# Altium PCB Octo-Electrode.PcbDoc (part 3 of 6)
Units mm, origin at the board's own origin, x right, y up, seen from the top; angles counter-clockwise.
Board outline 202.91 x 135.89 mm, 2 copper layers (Top Layer, Bottom Layer); 289 components, 165 nets, 790 pads, 510 vias.
Unrouted connection lines stored in the file: 83.
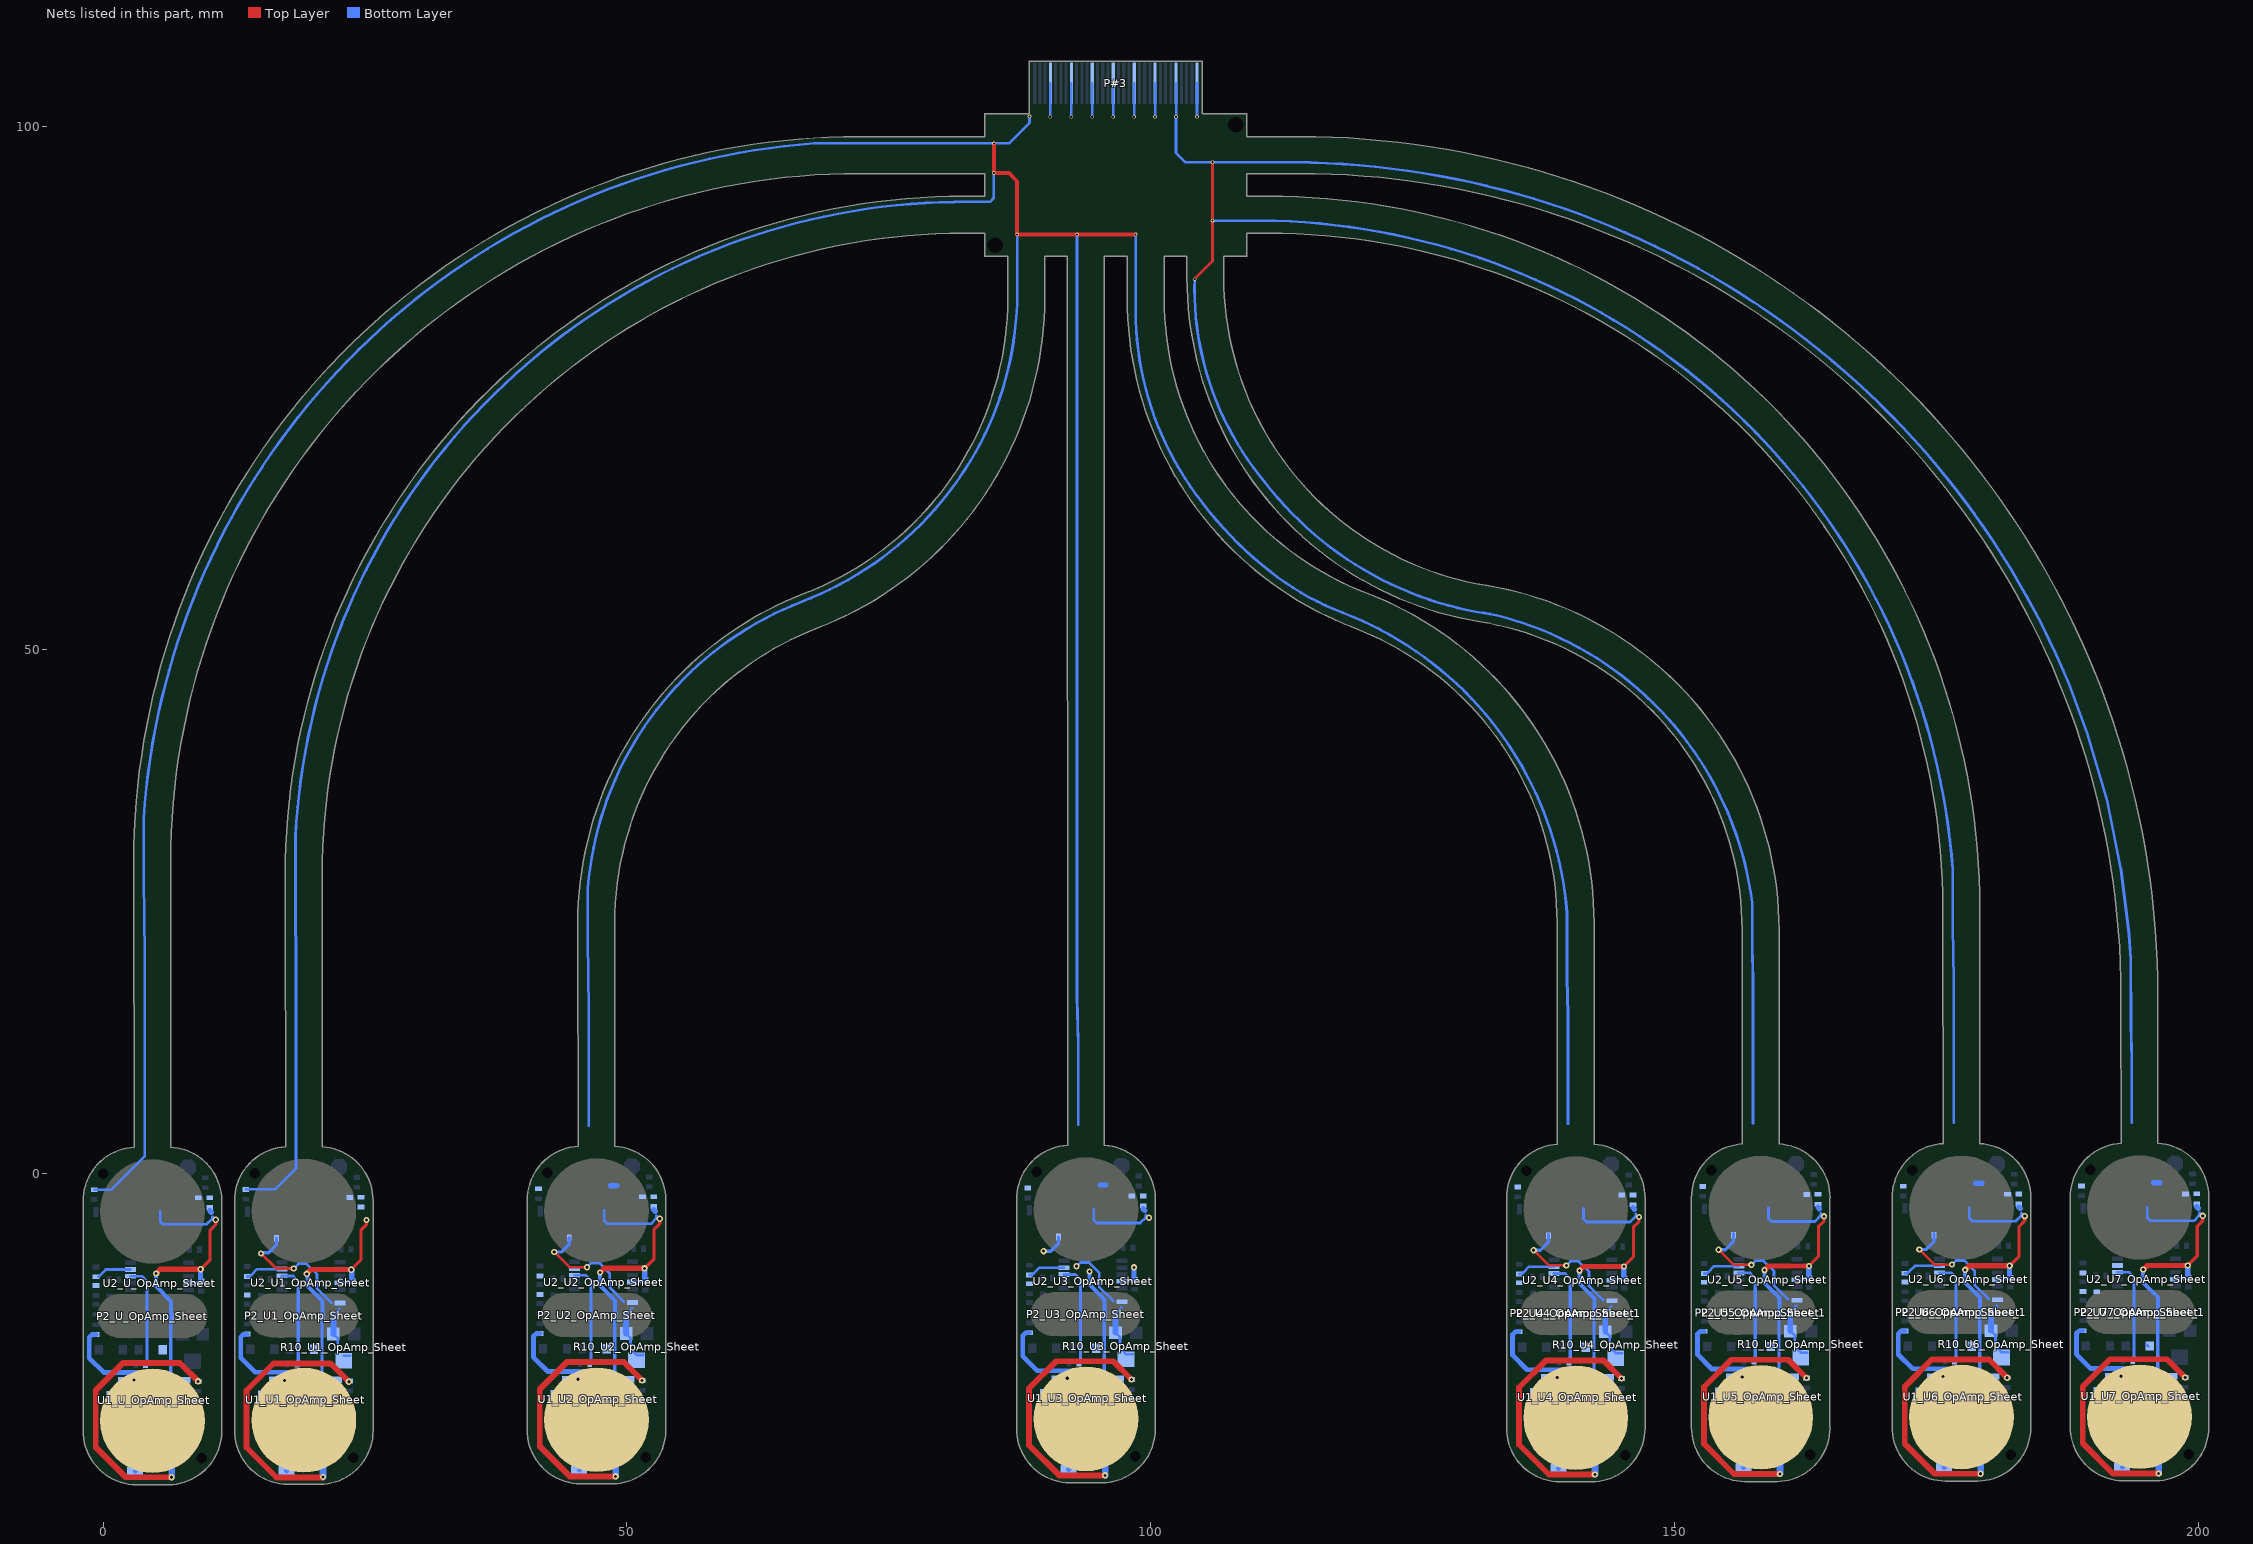
[diagram p2: the nets of this part, all layers, seen from the top]

## Via types
v1: diameter 0.6, hole 0.3, Top Layer to Bottom Layer, tented both sides, 464 vias
v2: diameter 0.35, hole 0.2, Top Layer to Bottom Layer, 46 vias

## Nets (pads, with @x,y where several pads share a name; then routed paths per layer and width w, separated by ;. In a path a pad name is that pad's centre, name@x,y a point inside that pad or via, vN(x,y) a via of type N, cw(c..) or ccw(c..) an arc to the next point about the centre after c; other vN are vias at no path point) (continued)
IN2N_U7_OpAmp_Sheet: R3_U7_OpAmp_Sheet.1 R4_U7_OpAmp_Sheet_1.2 R7_U7_OpAmp_Sheet.1 U2_U7_OpAmp_Sheet.6
IN2N_U_OpAmp_Sheet: R3_U_OpAmp_Sheet.1 R7_U_OpAmp_Sheet.1 U2_U_OpAmp_Sheet.6 | length 3.3
  Bottom Layer w0.254: R7_U_OpAmp_Sheet.1@-0.444,-9.842 -0.305,-9.703 0.259,-9.139 U2_U_OpAmp_Sheet.6@2.609,-9.139
IN2P_U1_OpAmp_Sheet: D2_U1_OpAmp_Sheet.1 R6_U1_OpAmp_Sheet.2 U2_U1_OpAmp_Sheet.5 | length 10.1
  Bottom Layer w0.254: U2_U1_OpAmp_Sheet.5@17.031,-9.765 17.056,-9.765 18.14,-9.765 18.625,-10.25 18.625,-10.948 ; D2_U1_OpAmp_Sheet.1@19.807,-16.737 19.807,-16.634 D2_U1_OpAmp_Sheet.1@20.014,-16.841
  Bottom Layer w0.305: R6_U1_OpAmp_Sheet.2@18.625,-18.162 18.625,-10.948
IN2P_U2_OpAmp_Sheet: D2_U2_OpAmp_Sheet.1 R6_U2_OpAmp_Sheet.2 U2_U2_OpAmp_Sheet.5 | length 10.1
  Bottom Layer w0.254: U2_U2_OpAmp_Sheet.5@44.974,-9.7 44.999,-9.7 46.082,-9.7 46.568,-10.186 46.568,-10.884 ; D2_U2_OpAmp_Sheet.1@47.749,-16.673 47.749,-16.569 D2_U2_OpAmp_Sheet.1@47.956,-16.776
  Bottom Layer w0.305: R6_U2_OpAmp_Sheet.2@46.568,-18.097 46.568,-10.884
IN2P_U3_OpAmp_Sheet: D2_U3_OpAmp_Sheet.1 R6_U3_OpAmp_Sheet.2 U2_U3_OpAmp_Sheet.5 | length 10.1
  Bottom Layer w0.254: U2_U3_OpAmp_Sheet.5@91.695,-9.624 91.72,-9.624 92.804,-9.624 93.289,-10.109 93.289,-10.807 ; D2_U3_OpAmp_Sheet.1@94.47,-16.597 94.47,-16.493 D2_U3_OpAmp_Sheet.1@94.678,-16.7
  Bottom Layer w0.305: R6_U3_OpAmp_Sheet.2@93.289,-18.021 93.289,-10.807
IN2P_U4_OpAmp_Sheet: D2_U4_OpAmp_Sheet.1 R6_U4_OpAmp_Sheet.2 U2_U4_OpAmp_Sheet.5 | length 10.1
  Bottom Layer w0.254: U2_U4_OpAmp_Sheet.5@138.45,-9.522 138.475,-9.522 139.559,-9.522 140.044,-10.008 140.044,-10.706 ; D2_U4_OpAmp_Sheet.1@141.225,-16.495 141.225,-16.391 D2_U4_OpAmp_Sheet.1@141.433,-16.599
  Bottom Layer w0.305: R6_U4_OpAmp_Sheet.2@140.044,-17.919 140.044,-10.706
IN2P_U5_OpAmp_Sheet: D2_U5_OpAmp_Sheet.1 R6_U5_OpAmp_Sheet.2 U2_U5_OpAmp_Sheet.5 | length 10.1
  Bottom Layer w0.254: U2_U5_OpAmp_Sheet.5@156.111,-9.472 156.136,-9.472 157.22,-9.472 157.705,-9.957 157.705,-10.655 ; D2_U5_OpAmp_Sheet.1@158.886,-16.444 158.886,-16.34 D2_U5_OpAmp_Sheet.1@159.094,-16.548
  Bottom Layer w0.305: R6_U5_OpAmp_Sheet.2@157.705,-17.869 157.705,-10.655
IN2P_U6_OpAmp_Sheet: D2_U6_OpAmp_Sheet.1 R6_U6_OpAmp_Sheet.2 U2_U6_OpAmp_Sheet.5 | length 10.1
  Bottom Layer w0.254: U2_U6_OpAmp_Sheet.5@175.27,-9.446 175.295,-9.446 176.379,-9.446 176.864,-9.932 176.864,-10.63 ; D2_U6_OpAmp_Sheet.1@178.045,-16.419 178.045,-16.315 D2_U6_OpAmp_Sheet.1@178.253,-16.522
  Bottom Layer w0.305: R6_U6_OpAmp_Sheet.2@176.864,-17.843 176.864,-10.63
IN2P_U7_OpAmp_Sheet: D2_U7_OpAmp_Sheet.1 R6_U7_OpAmp_Sheet.2 U2_U7_OpAmp_Sheet.5 | length 10.1
  Bottom Layer w0.254: U2_U7_OpAmp_Sheet.5@192.269,-9.421 192.294,-9.421 193.378,-9.421 193.863,-9.906 193.863,-10.604 ; D2_U7_OpAmp_Sheet.1@195.044,-16.393 195.044,-16.29 D2_U7_OpAmp_Sheet.1@195.252,-16.497
  Bottom Layer w0.305: R6_U7_OpAmp_Sheet.2@193.863,-17.818 193.863,-10.604
IN2P_U_OpAmp_Sheet: D2_U_OpAmp_Sheet.1 R6_U_OpAmp_Sheet.2 U2_U_OpAmp_Sheet.5 | length 9.7
  Bottom Layer w0.254: U2_U_OpAmp_Sheet.5@2.609,-9.789 3.693,-9.789 4.178,-10.275 4.178,-10.973
  Bottom Layer w0.305: R6_U_OpAmp_Sheet.2@4.178,-18.186 4.178,-10.973
Measure#_U1_OpAmp_Sheet: C3_U1_OpAmp_Sheet.1 P1_U1_OpAmp_Sheet.1 U1_U1_OpAmp_Sheet.7 | length 38.3
  Top Layer w0.254: v1@15.072,-7.597 16.522,-9.047 v1@18.2,-9.047
  Bottom Layer w0.254: v1@18.257,-8.997 18.643,-8.612 19.432,-8.612 20.416,-9.596 20.416,-10.948 21.762,-12.295 ; 21.972,-15.317 22.397,-15.742 22.397,-16.587 ; 21.972,-13.494 22.549,-12.917 ; 22.982,-17.375 23.184,-17.375 23.6,-17.375
  Bottom Layer w0.305: v1@15.13,-7.548 15.79,-7.548 16.543,-6.795 ; 16.548,-6.782 16.548,-6.167
  Bottom Layer w0.457: C3_U1_OpAmp_Sheet.1@13.761,-15.33 13.394,-15.33 13.126,-15.598 13.126,-17.578 14.498,-18.949 17.648,-18.949 18.41,-19.711 18.41,-21.896 18.41,-27.458 P1_U1_OpAmp_Sheet.1@17.495,-28.373 ; 18.511,-21.896 18.841,-22.226 U1_U1_OpAmp_Sheet.7@22.023,-22.226
  Bottom Layer w0.559: 21.972,-15.317 21.972,-13.494
  other v1: 18.195,-9.06 18.195,-9.06 15.067,-7.611 15.067,-7.611
Measure#_U2_OpAmp_Sheet: C3_U2_OpAmp_Sheet.1 P1_U2_OpAmp_Sheet.1 U1_U2_OpAmp_Sheet.7 | length 21.6
  Bottom Layer w0.457: C3_U2_OpAmp_Sheet.1@41.703,-15.265 41.337,-15.265 41.069,-15.533 41.069,-17.513 42.44,-18.885 45.59,-18.885 46.352,-19.647 46.352,-21.831 46.352,-27.394 P1_U2_OpAmp_Sheet.1@45.438,-28.308 ; 46.454,-21.831 46.784,-22.161 U1_U2_OpAmp_Sheet.7@49.966,-22.161
Measure#_U3_OpAmp_Sheet: C3_U3_OpAmp_Sheet.1 P1_U3_OpAmp_Sheet.1 U1_U3_OpAmp_Sheet.7 | length 21.6
  Bottom Layer w0.457: C3_U3_OpAmp_Sheet.1@88.425,-15.189 88.058,-15.189 87.79,-15.457 87.79,-17.437 89.162,-18.808 92.311,-18.808 93.073,-19.57 93.073,-21.755 93.073,-27.317 P1_U3_OpAmp_Sheet.1@92.159,-28.232 ; 93.175,-21.755 93.505,-22.085 U1_U3_OpAmp_Sheet.7@96.687,-22.085
Measure#_U4_OpAmp_Sheet: C3_U4_OpAmp_Sheet.1 P1_U4_OpAmp_Sheet.1 U1_U4_OpAmp_Sheet.7 | length 21.6
  Bottom Layer w0.457: C3_U4_OpAmp_Sheet.1@135.18,-15.087 134.813,-15.087 134.545,-15.355 134.545,-17.335 135.917,-18.707 139.066,-18.707 139.828,-19.469 139.828,-21.653 139.828,-27.216 P1_U4_OpAmp_Sheet.1@138.914,-28.13 ; 139.93,-21.653 140.26,-21.983 U1_U4_OpAmp_Sheet.7@143.442,-21.983
Measure#_U5_OpAmp_Sheet: C3_U5_OpAmp_Sheet.1 P1_U5_OpAmp_Sheet.1 U1_U5_OpAmp_Sheet.7 | length 21.6
  Bottom Layer w0.457: C3_U5_OpAmp_Sheet.1@152.841,-15.037 152.474,-15.037 152.206,-15.304 152.206,-17.284 153.578,-18.656 156.728,-18.656 157.49,-19.418 157.49,-21.602 157.49,-27.165 P1_U5_OpAmp_Sheet.1@156.575,-28.079 ; 157.591,-21.602 157.921,-21.933 U1_U5_OpAmp_Sheet.7@161.103,-21.933
Measure#_U6_OpAmp_Sheet: C3_U6_OpAmp_Sheet.1 P1_U6_OpAmp_Sheet.1 U1_U6_OpAmp_Sheet.7 | length 21.6
  Bottom Layer w0.457: C3_U6_OpAmp_Sheet.1@172,-15.011 171.633,-15.011 171.365,-15.279 171.365,-17.259 172.737,-18.631 175.886,-18.631 176.648,-19.393 176.648,-21.577 176.648,-27.14 P1_U6_OpAmp_Sheet.1@175.734,-28.054 ; 176.75,-21.577 177.08,-21.907 U1_U6_OpAmp_Sheet.7@180.262,-21.907
Measure#_U7_OpAmp_Sheet: C3_U7_OpAmp_Sheet.1 P1_U7_OpAmp_Sheet.1 U1_U7_OpAmp_Sheet.7 | length 21.6
  Bottom Layer w0.457: C3_U7_OpAmp_Sheet.1@188.999,-14.986 188.632,-14.986 188.364,-15.254 188.364,-17.234 189.736,-18.605 192.885,-18.605 193.647,-19.367 193.647,-21.552 193.647,-27.114 P1_U7_OpAmp_Sheet.1@192.733,-28.029 ; 193.749,-21.552 194.079,-21.882 U1_U7_OpAmp_Sheet.7@197.261,-21.882
Measure#_U_OpAmp_Sheet: C3_U_OpAmp_Sheet.1 P1_U_OpAmp_Sheet.1 U1_U_OpAmp_Sheet.7 | length 21.6
  Bottom Layer w0.457: C3_U_OpAmp_Sheet.1@-0.686,-15.354 -1.053,-15.354 -1.321,-15.622 -1.321,-17.602 0.051,-18.974 3.2,-18.974 3.962,-19.736 3.962,-21.92 3.962,-27.483 P1_U_OpAmp_Sheet.1@3.048,-28.397 ; 4.064,-21.92 4.394,-22.25 U1_U_OpAmp_Sheet.7@7.576,-22.25
Measure*_U1_OpAmp_Sheet: R10_U1_OpAmp_Sheet.1 R10_U1_OpAmp_Sheet.2 SB8_U1_OpAmp_Sheet.1 U2_U1_OpAmp_Sheet.14
Measure*_U2_OpAmp_Sheet: R10_U2_OpAmp_Sheet.1 R10_U2_OpAmp_Sheet.2 SB8_U2_OpAmp_Sheet.1 U2_U2_OpAmp_Sheet.14 | length 17.3
  Top Layer w0.254: v1(43.064,-7.481) 44.513,-8.93 v1(46.191,-8.93)
  Bottom Layer w0.254: v1@46.2,-8.933 46.585,-8.547 47.374,-8.547 48.359,-9.531 48.359,-10.884 49.705,-12.23 ; R10_U2_OpAmp_Sheet.1@49.915,-15.253 50.339,-15.677 50.339,-16.522 ; 49.915,-13.429 50.492,-12.852 ; 50.568,-16.954 50.924,-17.31 51.127,-17.31 R10_U2_OpAmp_Sheet.2@51.542,-17.31
  Bottom Layer w0.305: v1@43.072,-7.483 43.732,-7.483 44.485,-6.731 SB8_U2_OpAmp_Sheet.1@44.485,-6.116
  Bottom Layer w0.559: R10_U2_OpAmp_Sheet.1@49.915,-15.253 49.915,-13.429
  other v1: 46.191,-8.93 43.064,-7.481
Measure*_U3_OpAmp_Sheet: R10_U3_OpAmp_Sheet.1 R10_U3_OpAmp_Sheet.2 SB8_U3_OpAmp_Sheet.1 U2_U3_OpAmp_Sheet.14 | length 13.5
  Bottom Layer w0.254: v1@92.921,-8.856 93.307,-8.471 94.095,-8.471 95.08,-9.455 95.08,-10.807 96.426,-12.154 ; R10_U3_OpAmp_Sheet.1@96.636,-15.177 97.061,-15.601 97.061,-16.446 ; 96.636,-13.353 97.213,-12.776 ; 97.29,-16.878 97.645,-17.234 97.848,-17.234 R10_U3_OpAmp_Sheet.2@98.264,-17.234
  Bottom Layer w0.305: v1@89.793,-7.407 90.454,-7.407 91.206,-6.655 SB8_U3_OpAmp_Sheet.1@91.207,-6.04
  Bottom Layer w0.559: R10_U3_OpAmp_Sheet.1@96.636,-15.177 96.636,-13.353
  other v1: 92.907,-8.84 92.907,-8.84 89.779,-7.391 89.779,-7.391
Measure*_U4_OpAmp_Sheet: R10_U4_OpAmp_Sheet.1 R10_U4_OpAmp_Sheet.2 SB8_U4_OpAmp_Sheet.1 U2_U4_OpAmp_Sheet.14 | length 17.4
  Top Layer w0.254: v1(136.549,-7.305) 137.998,-8.755 v1(139.676,-8.755)
  Bottom Layer w0.254: v1(139.676,-8.755) 140.062,-8.369 140.85,-8.369 141.835,-9.354 141.835,-10.706 143.181,-12.052 ; R10_U4_OpAmp_Sheet.1@143.391,-15.075 143.816,-15.499 143.816,-16.345 ; 143.391,-13.251 143.968,-12.674 ; 144.045,-16.776 144.4,-17.132 144.603,-17.132 R10_U4_OpAmp_Sheet.2@145.019,-17.132
  Bottom Layer w0.305: v1(136.549,-7.305) 137.209,-7.305 137.962,-6.553 SB8_U4_OpAmp_Sheet.1@137.962,-5.753
  Bottom Layer w0.559: R10_U4_OpAmp_Sheet.1@143.391,-15.075 143.391,-13.251
  other v1: 139.676,-8.755 136.549,-7.305
Measure*_U5_OpAmp_Sheet: R10_U5_OpAmp_Sheet.1 R10_U5_OpAmp_Sheet.2 SB8_U5_OpAmp_Sheet.1 U2_U5_OpAmp_Sheet.14 | length 17.4
  Top Layer w0.254: v1(154.21,-7.255) 155.659,-8.704 v1(157.337,-8.704)
  Bottom Layer w0.254: v1(157.337,-8.704) 157.723,-8.318 158.512,-8.318 159.496,-9.303 159.496,-10.655 160.842,-12.001 ; R10_U5_OpAmp_Sheet.1@161.052,-15.024 161.477,-15.449 161.477,-16.294 ; 161.052,-13.201 161.629,-12.624 ; 161.706,-16.726 162.062,-17.081 162.264,-17.081 R10_U5_OpAmp_Sheet.2@162.68,-17.081
  Bottom Layer w0.305: v1(154.21,-7.255) 154.87,-7.255 155.623,-6.502 SB8_U5_OpAmp_Sheet.1@155.623,-5.702
  Bottom Layer w0.559: R10_U5_OpAmp_Sheet.1@161.052,-15.024 161.052,-13.201
  other v1: 157.337,-8.704 154.21,-7.255
Measure*_U6_OpAmp_Sheet: R10_U6_OpAmp_Sheet.1 R10_U6_OpAmp_Sheet.2 SB8_U6_OpAmp_Sheet.1 U2_U6_OpAmp_Sheet.14 | length 17.4
  Top Layer w0.254: v1(173.368,-7.229) 174.818,-8.679 v1(176.496,-8.679)
  Bottom Layer w0.254: v1(176.496,-8.679) 176.882,-8.293 177.67,-8.293 178.655,-9.277 178.655,-10.63 180.001,-11.976 ; R10_U6_OpAmp_Sheet.1@180.211,-14.999 180.636,-15.423 180.636,-16.268 ; 180.211,-13.175 180.788,-12.598 ; 180.865,-16.7 181.22,-17.056 181.423,-17.056 R10_U6_OpAmp_Sheet.2@181.839,-17.056
  Bottom Layer w0.305: v1(173.368,-7.229) 174.029,-7.229 174.781,-6.477 SB8_U6_OpAmp_Sheet.1@174.781,-5.677
  Bottom Layer w0.559: R10_U6_OpAmp_Sheet.1@180.211,-14.999 180.211,-13.175
  other v1: 176.496,-8.679 173.368,-7.229